# Altium PCB PCB_TEAM07_TH_PCB.PcbDoc
Units mil, origin at the board's own origin, x right, y up, seen from the top; angles counter-clockwise.
Board outline 3503.94 x 3377.95 mil, 2 copper layers (Top Layer, Bottom Layer); 55 components, 37 nets, 188 pads, 33 vias.
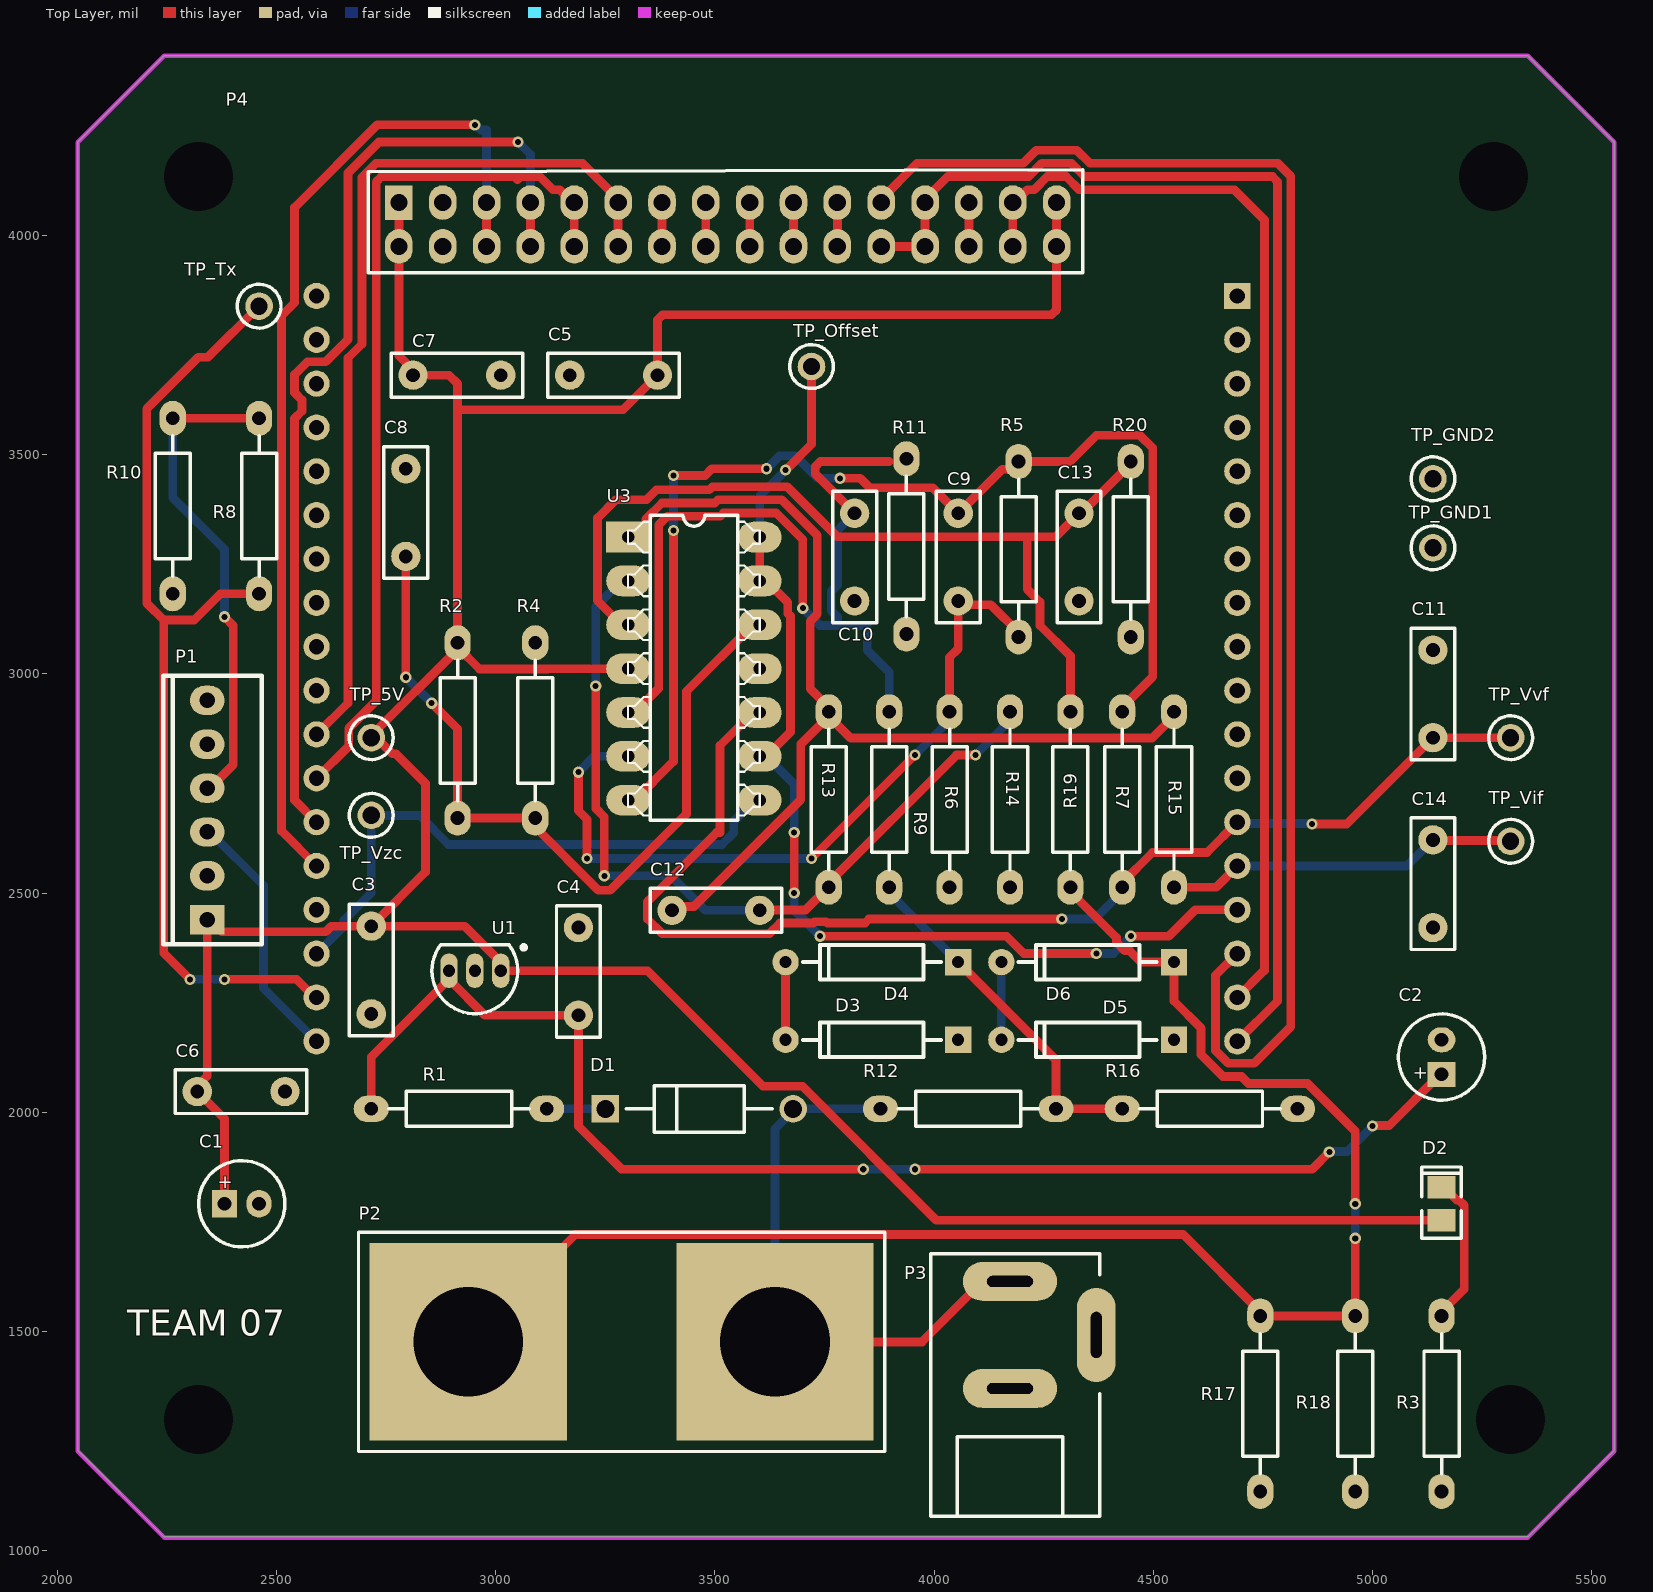
[diagram p0: Top Layer view]
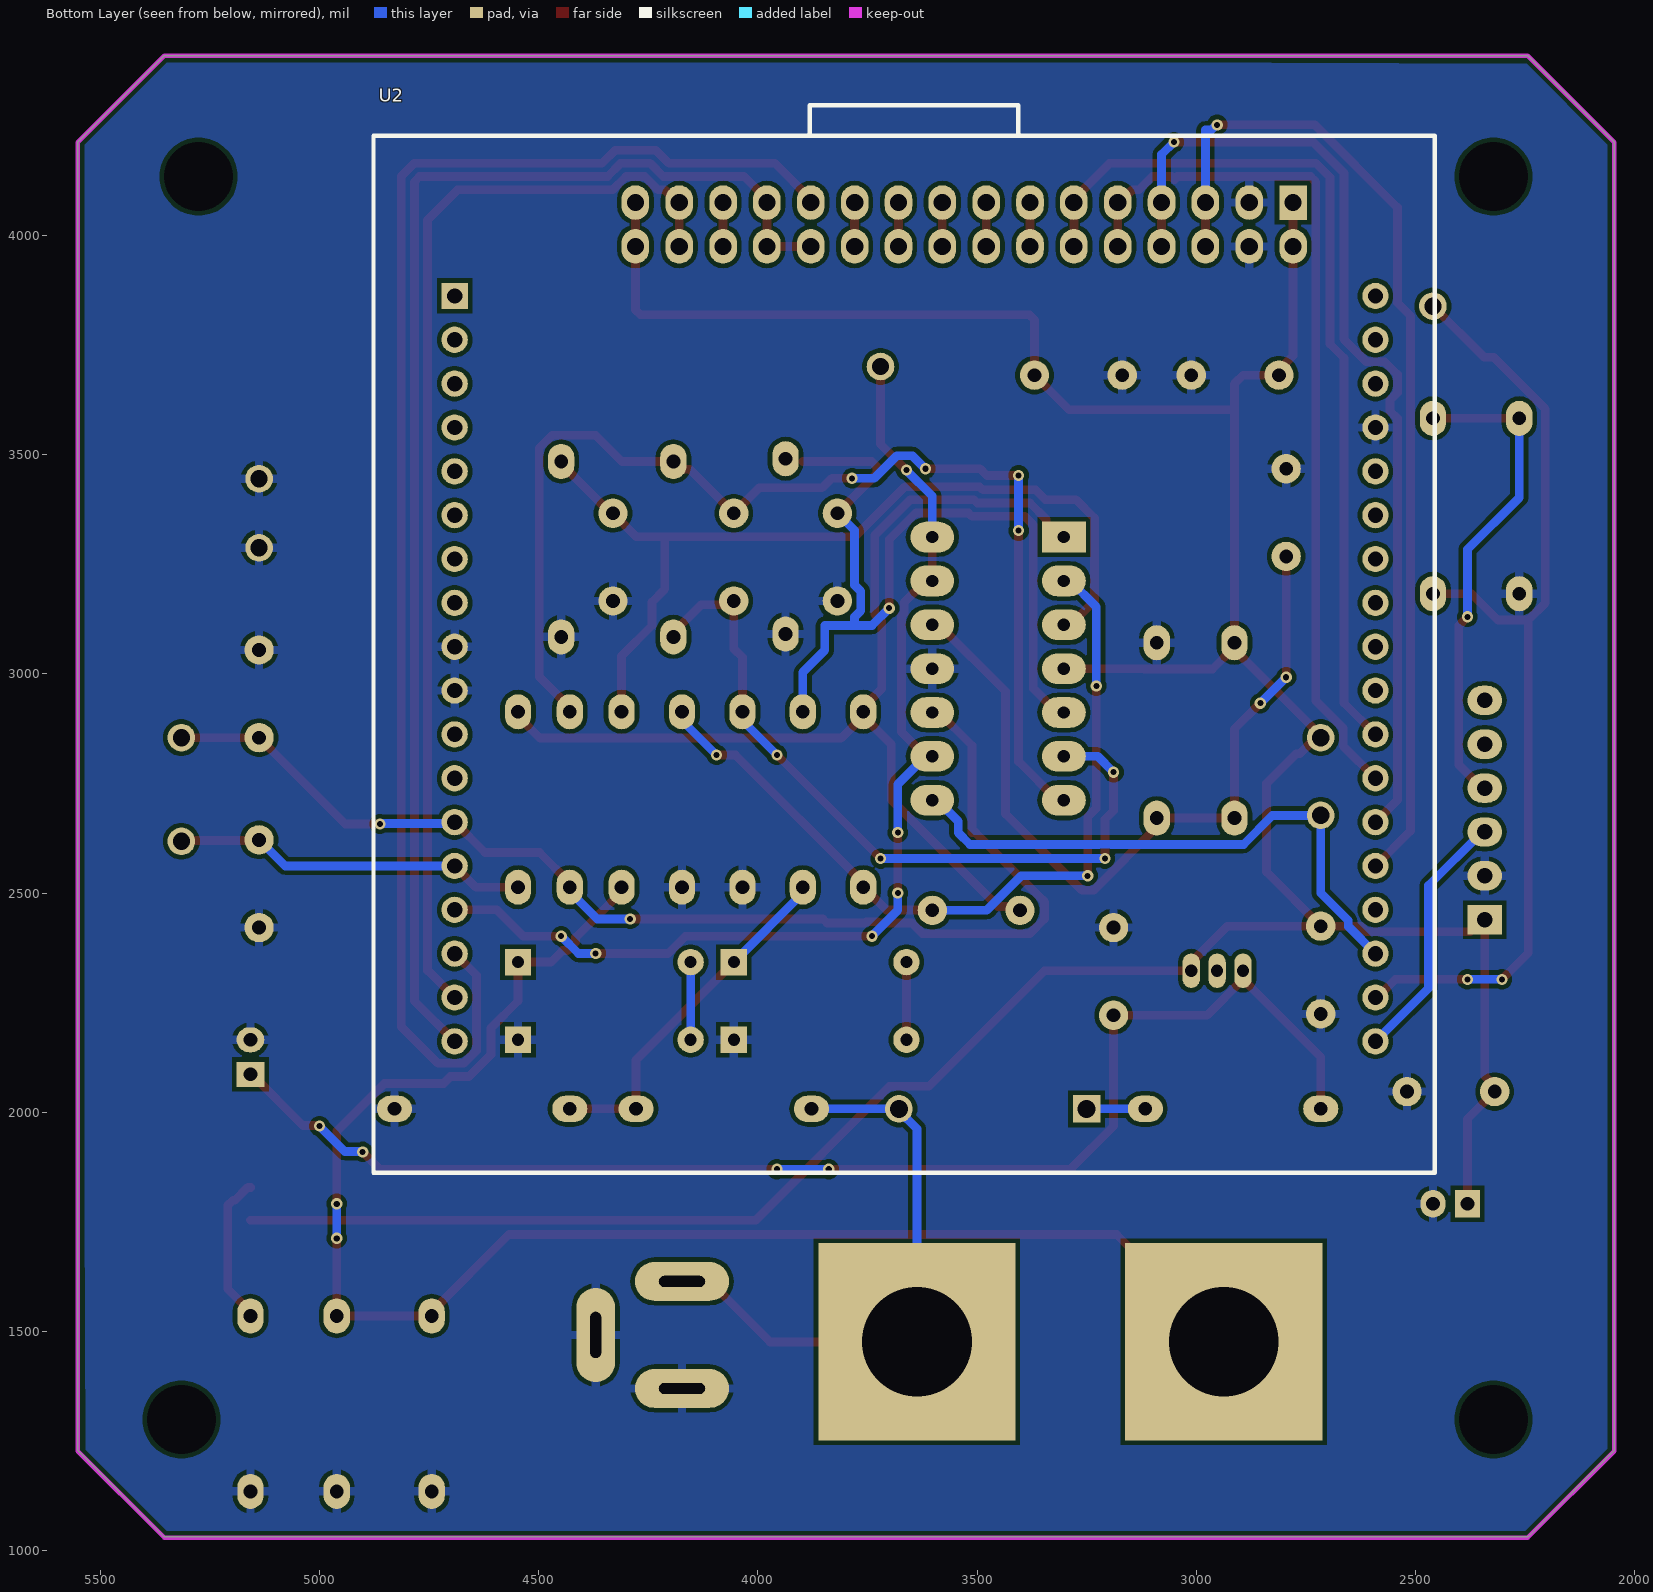
[diagram p1: Bottom Layer view, seen from below]

## Layer stack, top to bottom
Top Solder: solder mask 0.4, Solder Resist, Dk 3.5
Top Layer: signal copper 1.4
Dielectric 1: dielectric 12.6, FR-4, Dk 4.8
Bottom Layer: signal copper 1.4
Bottom Solder: solder mask 0.4, Solder Resist, Dk 3.5

## Board outline
2047.24,1228.35 2047.24,4212.6 2244.09,4409.45 5354.33,4409.45 5551.18,4212.6 5551.18,1228.35 5354.33,1031.5 2244.09,1031.5

## Design rules (kind name [scope] priority, off if disabled: settings)
BoardOutlineClearance [All] p1: gap=11.81 ignorepadtopadclearanceinfootprint=FALSE except(15.75: Arc-SplitBarrior Arc-SplitContinuation Track-SplitBarrior Track-SplitContinuation SMDPad-SplitBarrior SMDPad-SplitContinuation THPad-SplitBarrior THPad-SplitContinuation Via-SplitBarrior Via-SplitContinuation Fill-SplitBarrior Fill-SplitContinuation Poly-SplitBarrior Poly-SplitContinuation Region-SplitBarrior Region-SplitContinuation Text-SplitBarrior Text-SplitContinuation)
Clearance [All] p1: gap=10 ignorepadtopadclearanceinfootprint=TRUE
Height [All] p1: minheight=0 maxheight=1968.5 prefheight=500
HoleSize [All] p1: absolutevalues=TRUE maxlimit=472.44 minlimit=9.84 maxpercent=80.000 minpercent=20.000
MinimumAnnularRing [All] p1: minimumring=5.12
MinimumSolderMaskSliver [All] p1: minsoldermaskwidth=4
PolygonConnect [All] p1: thpad.connectstyle=Relief thpad.reliefconductorwidth=20 thpad.reliefentries=4 thpad.polygonreliefangle="90 Angle" thpad.airgapwidth=10 smdpad.connectstyle=Relief smdpad.reliefconductorwidth=20 smdpad.reliefentries=4 smdpad.polygonreliefangle="90 Angle" smdpad.airgapwidth=10 via.connectstyle=Direct via.reliefconductorwidth=20 via.reliefentries=4 via.polygonreliefangle="90 Angle" via.airgapwidth=10
RoutingVias [All] p1: holewidth=15.75 width=25.59 viastyle="Through Hole" minholewidth=9.84 minwidth=15.75 maxholewidth=39.37 maxwidth=78.74
SilkToSilkClearance [All] p1: silktosilkclearance=4
SilkToSolderMaskClearance [IsPad] p1: minsilkscreentomaskgap=4 clearancetoexposedcopper=TRUE
SolderMaskExpansion [All] p1: expansion=4 istentingtop=FALSE
SupplyNets "Schematic Supply Nets_24" [InNet('LED4')] p1: voltage=0.000
SupplyNets "Schematic Supply Nets_23" [InNet('Isensp')] p2: voltage=0.000
SupplyNets "Schematic Supply Nets_22" [InNet('TX')] p3: voltage=0.000
SupplyNets "Schematic Supply Nets_21" [InNet('GND')] p4: voltage=0.000
SupplyNets "Schematic Supply Nets_20" [InNet('Vin')] p5: voltage=0.000
SupplyNets "Schematic Supply Nets_19" [InNet('RX')] p6: voltage=0.000
SupplyNets "Schematic Supply Nets_18" [InNet('OE')] p7: voltage=0.000
SupplyNets "Schematic Supply Nets_17" [InNet('Offset')] p8: voltage=0.000
SupplyNets "Schematic Supply Nets_16" [InNet('SRCLR')] p9: voltage=0.000
SupplyNets "Schematic Supply Nets_15" [InNet('DS3')] p10: voltage=0.000
SupplyNets "Schematic Supply Nets_14" [InNet('LED3')] p11: voltage=0.000
SupplyNets "Schematic Supply Nets_13" [InNet('DS1')] p12: voltage=0.000
SupplyNets "Schematic Supply Nets_12" [InNet('Vmeas')] p13: voltage=0.000
SupplyNets "Schematic Supply Nets_11" [InNet('SH_CP')] p14: voltage=0.000
SupplyNets "Schematic Supply Nets_10" [InNet('SH_DS')] p15: voltage=0.000
SupplyNets "Schematic Supply Nets_9" [InNet('5V')] p16: voltage=0.000
SupplyNets "Schematic Supply Nets_8" [InNet('DS2')] p17: voltage=0.000
SupplyNets "Schematic Supply Nets_7" [InNet('Vzc')] p18: voltage=0.000
SupplyNets "Schematic Supply Nets_6" [InNet('Imeas')] p19: voltage=0.000
SupplyNets "Schematic Supply Nets_5" [InNet('Vsensp')] p20: voltage=0.000
SupplyNets "Schematic Supply Nets_4" [InNet('Vrect')] p21: voltage=0.000
SupplyNets "Schematic Supply Nets_3" [InNet('SH_ST')] p22: voltage=0.000
SupplyNets "Schematic Supply Nets_2" [InNet('DS4')] p23: voltage=0.000
SupplyNets "Schematic Supply Nets_1" [InNet('LED2')] p24: voltage=0.000
SupplyNets "Schematic Supply Nets" [InNet('LED1')] p25: voltage=0.000
Width [All] p1: maxlimit=400 minlimit=5 preferedwidth=20
25 further rules are at their usual default settings.

## Components (designator, comment, footprint, x,y, rotation, side; value= is the part's Value field where it differs from the comment)
C1 "CAP000212" ECE-CAPPR2-5X11TH 2381.89,1791.34 r0 top value=22uF
C2 "CAP000212" ECE-CAPPR2-5X11TH 5157.48,2086.61 r90 top value=22uF
C3 "CAP000004" ECE-CAPR0.2x0.1TH 2716.54,2424.41 r270 top value=18pF
C4 "CAP000004" ECE-CAPR0.2x0.1TH 3188.98,2221.26 r90 top value=18pF
C5 "CAP000004" ECE-CAPR0.2x0.1TH 3369.29,3681.1 r180 top value=18pF
C6 "CAP000004" ECE-CAPR0.2x0.1TH 2319.68,2047.24 r0 top value=18pF
C7 "CAP000004" ECE-CAPR0.2x0.1TH 2811.81,3681.1 r0 top value=18pF
C8 "CAP000004" ECE-CAPR0.2x0.1TH 2795.28,3267.72 r90 top value=18pF
C9 "CAP000004" ECE-CAPR0.2x0.1TH 4055.12,3366.14 r270 top value=18pF
C10 "CAP000004" ECE-CAPR0.2x0.1TH 3818.9,3366.14 r270 top value=18pF
C11 "CAP000004" ECE-CAPR0.2x0.1TH 5137.8,2854.33 r90 top value=18pF
C12 "CAP000004" ECE-CAPR0.2x0.1TH 3402.36,2460.63 r0 top value=18pF
C13 "CAP000004" ECE-CAPR0.2x0.1TH 4330.71,3366.14 r270 top value=18pF
C14 "CAP000004" ECE-CAPR0.2x0.1TH 5137.8,2621.26 r270 top value=18pF
D1 "1N4007" D-AXIAL0.4 3464.57,2007.87 r0 top
D2 "DIO000104" ECE-LED2012-0805SM 5157.48,1791.34 r90 top value=LTST-C170KGKT
D3 "ZEN000010" ECE-DIOAD2TH1.00 3858.27,2165.35 r180 top value=BZX79-C8V2
D4 "ZEN000010" ECE-DIOAD2TH1.00 3858.27,2342.52 r180 top value=BZX79-C8V2
D5 "ZEN000010" ECE-DIOAD2TH1.00 4350.39,2165.35 r180 top value=BZX79-C8V2
D6 "ZEN000010" ECE-DIOAD2TH1.00 4350.39,2342.52 r180 top value=BZX79-C8V2
P1 "CON000004" ECE-600106STTH 2342.52,2439.37 r180 top value="6 Way"
P2 "Dual Banana Connector" "Dual Banana Connector-Footprint-1" 3287.4,1476.38 r180 top
P3 "AC_Input" "Barrel Jack-Footprint-1" 4173.23,1377.95 r90 top
P4 "7-Segment Display" "7-Segment Display-Footprint-1" 3479.53,4024.8 r180 top
R1 "RES000005" ECE-RESA0.4TH 3116.69,2008.19 r180 top value=2.2
R2 "RES000005" ECE-RESA0.4TH 2913.7,2670.71 r90 top value=2.2
R3 "RES000005" ECE-RESA0.4TH 5157.8,1135.28 r90 top value=2.2
R4 "RES000005" ECE-RESA0.4TH 3090.24,3071.02 r270 top value=2.2
R5 "RES000005" ECE-RESA0.4TH 4193.23,3084.09 r90 top value=2.2
R6 "RES000005" ECE-RESA0.4TH 4035.75,2513.23 r90 top value=2.2
R7 "RES000005" ECE-RESA0.4TH 4429.45,2513.23 r90 top value=2.2
R8 "RES000005" ECE-RESA0.4TH 2460.31,3582.83 r270 top value=2.2
R9 "RES000005" ECE-RESA0.4TH 3897.95,2513.23 r90 top value=2.2
R10 "RES000005" ECE-RESA0.4TH 2264.09,3182.52 r90 top value=2.2
R11 "RES000005" ECE-RESA0.4TH 3937.32,3090.39 r90 top value=2.2
R12 "RES000005" ECE-RESA0.4TH 4278.11,2008.19 r180 top value=2.2
R13 "RES000005" ECE-RESA0.4TH 3760.16,2513.23 r90 top value=2.2
R14 "RES000005" ECE-RESA0.4TH 4173.54,2513.23 r90 top value=2.2
R15 "RES000005" ECE-RESA0.4TH 4547.56,2513.23 r90 top value=2.2
R16 "RES000005" ECE-RESA0.4TH 4829.29,2008.19 r180 top value=2.2
R17 "RES000005" ECE-RESA0.4TH 4744.41,1135.28 r90 top value=2.2
R18 "RES000005" ECE-RESA0.4TH 4960.94,1135.28 r90 top value=2.2
R19 "RES000005" ECE-RESA0.4TH 4311.34,2513.23 r90 top value=2.2
R20 "RES000005" ECE-RESA0.4TH 4449.13,3084.09 r90 top value=2.2
TP_5V "" Test-Pin-TH 2716.54,2854.33 r90 top
TP_GND1 "" Test-Pin-TH 5137.8,3287.4 r90 top
TP_GND2 "" Test-Pin-TH 5137.8,3444.88 r90 top
TP_Offset "" Test-Pin-TH 3720.47,3700.79 r90 top
TP_Tx "" Test-Pin-TH 2460.63,3838.58 r90 top
TP_Vif "" Test-Pin-TH 5314.96,2618.11 r90 top
TP_Vvf "" Test-Pin-TH 5314.96,2854.33 r90 top
TP_Vzc "" Test-Pin-TH 2716.54,2677.17 r0 top
U1 "L78L05ACZ" TO-92 2952.76,2322.83 r90 top
U2 "ATMEGA328P/PB-XMINI" FP-ATMEGA328P-XMINI-MFG 3641.73,3011.81 r180 bottom
U3 "OPA000002" ECE-DIP14TH 3302.36,3311.81 r0 top value=LM324N

## Footprints (in the part's own frame and the unit in brackets; to place one, negate y for a bottom-side part, rotate by r counter-clockwise, add the part's x,y. Pads: shape width x height; smd on the part's side, far side on the other; paste and mask are expansions set on the pad)
"7-Segment Display-Footprint-1" [mm]
  rect 1.6x2 hole 1: 1(17.78,-1.27)
  oval 1.6x2 hole 1: 2(17.78,1.27) 3(15.24,-1.27) 4(15.24,1.27) 5(12.7,-1.27) 6(12.7,1.27) 7(10.16,-1.27) 8(10.16,1.27) 9(7.62,-1.27) 10(7.62,1.27) 11(5.08,-1.27) 12(5.08,1.27) 13(2.54,-1.27) 14(2.54,1.27) 15(0,-1.27) 16(0,1.27) 17(-2.54,-1.27) 18(-2.54,1.27) 19(-5.08,-1.27) 20(-5.08,1.27) 21(-7.62,-1.27) 22(-7.62,1.27) 23(-10.16,-1.27) 24(-10.16,1.27) 25(-12.7,-1.27) 26(-12.7,1.27) 27(-15.24,-1.27) 28(-15.24,1.27) 29(-17.78,-1.27) 30(-17.78,1.27) 31(-20.32,-1.27) 32(-20.32,1.27)
  silkscreen extent -21.84,-3.18 19.56,2.79, body extent -32.6,-50 26.4,4, height 16.89
"Barrel Jack-Footprint-1" [mm]
  oval 2.25x5.45 hole 0.635 slot 2.667 at 90 deg: 1(6,0) 3(-0.2,0)
  oval 5.45x2.25 hole 0.635 slot 2.667 at 0 deg: 2(2.9,-5)
  silkscreen extent -7.6,-5.2 7.6,4.6, body extent -6.7,-5 6,4.2, height 10.5
D-AXIAL0.4 [mm] "AXIAL, 2-Leads, Diameter 2.35mm"
  rect 1.6x1.6 hole 1.05 paste-2539.97 mask+0: 1(-5.438,0)
  round 1.6 hole 1.05 paste-2539.97 mask+0: 2(5.438,0)
  silkscreen extent -4.24,-1.35 4.24,1.35, body extent -6.34,-1.45 6.34,1.45, height 0.25
"Dual Banana Connector-Footprint-1" [mil]
  rect 450x450 hole 250: 1(-350,0) 2(350,0)
  silkscreen extent -600,-250 600,250, body extent -584,-236 586,236, height 217
ECE-600106STTH [mm] "Polarised Header 6 way"
  rect 2x1.7 hole 0.9: 1(0,0)
  oval 2x1.7 hole 0.9: 2(0,-2.54) 3(0,-5.08) 4(0,-7.62) 5(0,-10.16) 6(0,-12.7)
  silkscreen extent -3.16,-14.12 2.54,1.42
ECE-CAPPR2-5X11TH [mm] "Polarised Radial Cap Dia 5mm"
  rect 1.45x1.6 hole 0.8: 1(0,0)
  oval 1.45x1.6 hole 0.8: 2(2,0)
  silkscreen extent -1.5,-2.5 3.5,2.5, body extent -1.5,-2.5 3.5,2.5, height 11.43
ECE-CAPR0.2x0.1TH [mm] "Radial non polarised Capacitor"
  round 1.7 hole 0.8: 1(0,0) 2(5.08,0)
  silkscreen extent -1.27,-1.27 6.35,1.27
ECE-DIOAD2TH1.00 [mil] "Axial 10mm diode"
  rect 60x60 hole 27.56: 1(-196.85,0)
  round 60 hole 27.56: 2(196.85,0)
  silkscreen extent -157,-39 157,39
ECE-DIP14TH [mil] "14 pin Dual in line"
  rect 100x70 hole 28: 1(0,0)
  oval 100x70 hole 28: 2(0,-100) 3(0,-200) 4(0,-300) 5(0,-400) 6(0,-500) 7(0,-600) 8(300,-600) 9(300,-500) 10(300,-400) 11(300,-300) 12(300,-200) 13(300,-100) 14(300,0)
  silkscreen extent 0,-646 300,50
ECE-LED2012-0805SM [mm] "RED AS AlGaAs SMD LED, Body; 2mm x 1.25 mm (LxW)"
  rect 1.3x1.6 smd: 1(-0.95,0) 2(0.95,0)
  silkscreen extent -2,-1.15 2.13,1.15
ECE-RESA0.4TH [mil] "Resistor Axial 10mm"
  oval 80x60 hole 31.5: 1(0.16,0.32) 2(400.16,0.32)
  silkscreen extent 40,-40 360,40, body extent -7,-47 417,47, height 95
FP-ATMEGA328P-XMINI-MFG [mil]
  rect 60x60 hole 35: 1(-1050,850)
  round 60 hole 35: 2(-1050,750) 3(-1050,650) 4(-1050,550) 5(-1050,450) 6(-1050,350) 7(-1050,250) 8(-1050,150) 9(-1050,50) 10(-1050,-50) 11(-1050,-150) 12(-1050,-250) 13(-1050,-350) 14(-1050,-450) 15(-1050,-550) 16(-1050,-650) 17(-1050,-750) 18(-1050,-850) 19(1050,-850) 20(1050,-750) 21(1050,-650) 22(1050,-550) 23(1050,-450) 24(1050,-350) 25(1050,-250) 26(1050,-150) 27(1050,-50) 28(1050,50) 29(1050,150) 30(1050,250) 31(1050,350) 32(1050,450) 33(1050,550) 34(1050,650) 35(1050,750) 36(1050,850)
  silkscreen extent -1235,-1150 1185,1285, body extent -1206,-1151 1156,1844, height 650
Test-Pin-TH [mm]
  round 1.6 hole 1: 1(0,0)
  silkscreen extent -1.27,-1.27 1.27,1.27, body extent -1.27,-1.27 1.27,1.27, height 4.57
TO-92 [mm] "TO, Flat Index; 3 In-Line, Axial Leads; Body Dia. 4.7mm; Lead Dia. 0.56 mm (max)"
  oval 2x1 hole 0.7: 1(0,-1.5) 2(0,0) 3(0,1.5)
  silkscreen extent -2.48,-2.96 1.5,2.48, body extent -2.4,-2.4 1.53,2.4, height 6.73

## Part data
C1 C2: library part CMP-039-000101-1, "CAP ELEC 22uF 25V TH", Manufactuer=Nichicon, Manufacturer-PN=UVZ1E220MDD, Size/Package=5X11, Voltage/Current=25V, Assembly Method="Through hole", Category=Capacitor, Component Type=NA, Datasheet Link=http://share.engineering.auckland.ac.nz/ece/ts/Student%20Documents/CAP-UVZ1E100MDD.pdf, Item Type=Item, Path="ece/ts/Lists/Stock Inventory", Review-date=41979, Status=Active, Supplier1=Electus, Supplier1-PN=RE6090, UoA Stock#=CAP000212
C3 C4 C5 C6 C7 C8 C9 C10 C11 C12 C13 C14: library part CMP-039-000003-1, "CAP CER 18pF 50V TH", Size/Package=Radial, Voltage/Current=50V, Assembly Method="Through hole", Category=Capacitor, Component Type=NA, Datasheet Link=http://share.engineering.auckland.ac.nz/ece/ts/Student%20Documents/CER%20CAP.pdf, Item Type=Item, Path="ece/ts/Lists/Stock Inventory", Status=Obsolete, UoA Stock#=CAP000004
D1: library part CMP-00015-1, "Standard Rectifier Diode Switching 1KV 1A Axial 0.4", Current Rating=1A, Forward Voltage=1.1V
D2: library part CMP-043-000010-1, "LED GREEN CLEAR 0805 SM", Manufactuer="Lite-On Inc", Manufacturer-PN=LTST-C170KGKT, Size/Package="0805 (2012 Metric)", Voltage/Current=20mA, Assembly Method="Surface Mount", Category=Diode, Component Type=LED-0805-GREEN, Datasheet Link=http://share.engineering.auckland.ac.nz/ece/ts/Student%20Documents/LED-S_110_LTST-C170KGKT.pdf, Item Type=Item, Path="ece/ts/Lists/Stock Inventory", Status=Active, Supplier1=Digikey, Supplier1-PN=160-1414-6-ND, UoA Stock#=DIO000104
D3 D4 D5 D6: library part CMP-055-000009-1, "8.2V Zener Diodes TH", Manufactuer=NXP, Manufacturer-PN=BZX79-C8V2, Voltage/Current=8.2V, Assembly Method="Through hole", Category=Zener, Item Type=Item, Path="ece/ts/Lists/Stock Inventory", Status=Active, Supplier1=Element14, Supplier1-PN=1097242, UoA Stock#=ZEN000010
P1: library part CMP-040-000003-1, "HEADER POLARISED 6WAY TH", Manufactuer=GTK, Manufacturer-PN=600106ST, Size/Package="2.54 Radial", Assembly Method="Through hole", Category=Connector, Component Type=NA, Datasheet Link=http://share.engineering.auckland.ac.nz/ece/ts/Student%20Documents/polarised_connectors.pdf, Item Type=Item, Path="ece/ts/Lists/Stock Inventory", Status=Active, Supplier1=Elecon, Supplier1-PN=YY3N06, Supplier2="Active Components", Supplier2-PN=600106ST, UoA Stock#=CON000004
P2: library part CMP-00017-1, "Dual Banan connector"
P3: library part CMP-002-00000-1, "Barrel jack"
P4: library part CMP-00020-1, "7-Segment display for EC209"
R1 R2 R3 R4 R5 R6 R7 R8 R9 R10 R11 R12 R13 R14 R15 R16 R17 R18 R19 R20: library part CMP-052-000004-1, "RES MF 2R2 TH", Size/Package="Axial 10mm", Voltage/Current=0.6W, Assembly Method="Through hole", Category=Resistor, Component Type=NA, Item Type=Item, Path="ece/ts/Lists/Stock Inventory", Status=Active, Supplier1="Active components", Supplier1-PN=T462168, UoA Stock#=RES000005
TP_5V TP_GND1 TP_GND2 TP_Offset TP_Tx TP_Vif TP_Vvf TP_Vzc: library part CMP-00024-1, "Test pin TH generic"
U1: library part CMP-00021-1, "Pwr Sply Func, Voltage Regulator, Positive Voltage Out, TO-92, Is 5.5MA, Vo 5V, VI 10V", Case/Package=TO-92, Max Output current=100mA, Max Supply Voltage=20V, Output Voltage=5V, Output Voltage Accuracy=4%, Power Supply Rejection Ratio (PSRR)=49dB, Quiescent Current=6mA
U2: library part CMP-00018-1, "Evaluation Board, ATMEGA328P/PB MCU, On-Board Debugger, Auto-ID Identification", Max Supply Voltage=5V, Number of Bits=8, Number of I/Os=22
U3: library part CMP-049-000001-1, "IC OPAMP LM324 QUAD TH", Manufactuer="Texas instruments", Manufacturer-PN=LM324N, Size/Package=DIP14, Assembly Method="Through hole", Category=OpAmp, Datasheet Link=http://share.engineering.auckland.ac.nz/ece/ts/Student%20Documents/LM324.pdf, Item Type=Item, Path="ece/ts/Lists/Stock Inventory", Status=Active, Supplier1=Digikey, Supplier1-PN=296-1391-5-ND, Supplier2="Active Components", Supplier2-PN=LM324N, UoA Stock#=OPA000002

## Free pads (board coordinates)
  oval 157x60 hole 157 unplated: 5(2322.83,1299.21) 5(2322.83,4133.86) 5(5275.59,4133.86) 5(5314.96,1299.21)

## Via types
v1: diameter 25.59, hole 13.78, Top Layer to Bottom Layer, 33 vias

## Nets (pads, with @x,y where several pads share a name; then routed paths per layer and width w, separated by ;. In a path a pad name is that pad's centre, name@x,y a point inside that pad or via, vN(x,y) a via of type N, cw(c..) or ccw(c..) an arc to the next point about the centre after c; other vN are vias at no path point)
5V: C1.1 C3.1 C5.1 C6.1 C7.1 D2.1 P1.1 P4.1 P4.2 P4.31 P4.32 R2.2 TP_5V.1 U1.1 U3.4 | length 7936.2
  Top Layer w20: P1.1 2342.52,2082.78 2319.68,2059.94 C6.1 2381.89,1985.04 C1.1 ; P1.1@2348.43,2439.37 2375.98,2411.81 2612.44,2411.81 2625.04,2424.41 C3.1 ; P4.1 P4.2 2779.53,3726.08 2811.81,3693.8 C7.1 2893.7,3681.1 2913.39,3661.42 2913.39,3602.36 ; U3.4 3119.71,3011.81 3118.76,3010.87 2963.39,3010.87 R2.2@2913.39,3060.87 ; P4.31 P4.32 4279.53,3830.61 4267.81,3818.9 3381.01,3818.9 3369.29,3807.18 C5.1 3290.55,3602.36 2913.39,3602.36 ; D2.1 4005.43,1753.94 3699.99,2059.37 3609.92,2059.37 3346.46,2322.83 U1.1 3011.81,2342.52 2929.92,2424.41 C3.1 ; C3.1 2840,2547.87 2840,2750.55 2772.73,2817.82 2764.68,2817.82 2728.17,2854.33 TP_5V.1 2716.54,2859.17 2913.39,3056.02 R2.2@2913.39,3060.87 ; R2.2@2913.39,3060.87 R2.2 2913.39,3602.36
DS1: P4.5 P4.6 U2.23 | length 2333.4
  Top Layer w20: U2.23 2511.73,2641.81 2511.73,3816.86 2541.73,3846.86 2541.73,4063.44 2730.26,4251.97 v1(2952.76,4251.97) ; P4.6 P4.5
  Bottom Layer w20: v1(2952.76,4251.97) 2954.27,4251.97 2965.98,4240.25 2979.53,4240.25 P4.5
DS2: P4.7 P4.8 U2.24 | length 2256.5
  Top Layer w20: U2.24 2541.73,2711.81 2541.73,3582.52 2558.6,3599.38 2558.6,3624.24 2541.73,3641.1 2541.73,3682.52 2571.02,3711.81 2612.44,3711.81 2663.67,3763.04 2663.67,4142.95 2733.32,4212.6 v1(3051.18,4212.6) ; P4.8 P4.7
  Bottom Layer w20: v1(3051.18,4212.6) 3079.53,4184.25 P4.7
DS3: P4.9 P4.10 U2.25 | length 2003.9
  Top Layer w20: U2.25 2665.04,2835.12 2665.04,2875.66 2728.03,2938.65 2728.03,4122.46 2739.75,4134.17 3043.08,4134.17 3050.1,4127.15 3057.12,4134.17 3100.86,4134.17 3130.86,4104.17 3146.4,4104.17 3175.77,4074.8 P4.9 P4.10
DS4: P4.11 P4.12 U2.26 | length 2052.4
  Top Layer w20: U2.26 2663.35,2933.43 2663.35,3720.3 2695.34,3752.28 2695.34,4132.19 2727.32,4164.17 3198.03,4164.17 3279.53,4082.68 P4.11 P4.12
GND: C1.2 C2.2 C3.2 C4.2 C5.2 C6.2 C7.2 C8.2 C10.2 C11.2 C13.2 C14.2 D3.1 D5.1 P1.2 P3.2 P3.3 P4.3 P4.4 R3.1 R4.1 R6.1 R10.1 R11.1 R14.1 R16.1 R17.1 R18.1 R20.1 TP_GND1.1 TP_GND2.1 U2.9 U2.10 U2.33 U3.11
Imeas: C14.1 R15.1 TP_Vif.1 U2.14 | length 813.7
  Top Layer w20: R15.1 4643.31,2513.39 U2.14 ; C14.1 5139.37,2619.68 5313.39,2619.68 TP_Vif.1
  Bottom Layer w20: U2.14 5078.35,2561.81 C14.1
Isensp: D6.1 P2.2 R17.2 R18.2 R19.1 | length 3608.7
  Top Layer w20: P2.2 3182.4,1721.38 4568.15,1721.38 4744.09,1545.43 R17.2 R18.2 v1(4960.63,1712.6) ; R19.1 4311.02,2503.39 4416.02,2398.39 4416.02,2387.99 4435.23,2368.78 4445.63,2368.78 4471.89,2342.52 D6.1 4547.24,2253.64 4609.13,2191.75 4609.13,2131.27 4658.6,2081.81 4701.02,2081.81 4717.44,2065.39 4852.32,2065.39 4960.63,1957.09 v1(4960.63,1791.34)
  Bottom Layer w20: v1(4960.63,1712.6) v1(4960.63,1791.34)
LED1: P4.13 P4.14 | length 100
  Top Layer w20: P4.14 P4.13
LED2: P4.15 P4.16 | length 100
  Top Layer w20: P4.16 P4.15
LED3: P4.17 P4.18 | length 100
  Top Layer w20: P4.18 P4.17
LED4: P4.19 P4.20 | length 100
  Top Layer w20: P4.20 P4.19
NetC8_1: C8.1 R2.1 R4.2 U3.12 | length 1829.2
  Top Layer w20: v1(2795.28,2992.13) C8.1 ; v1(2854.33,2933.07) 2913.39,2874.02 R2.1 R4.2 3090.55,2650.47 3234.45,2506.57 3261.62,2506.57 3435.51,2680.47 3435.51,2959.96 3587.36,3111.81 U3.12
  Bottom Layer w20: v1(2795.28,2992.13) v1(2854.33,2933.07)
NetC9_1: C9.1 R5.2 R7.2 U3.7 | length 2674.7
  Top Layer w20: U3.7 3317.36,2711.81 3405.51,2799.96 v1(3405.51,3326.77) ; v1(3405.51,3452.36) 3477.93,3452.36 3493.22,3467.65 v1(3618.13,3467.65) ; v1(3785.46,3445.96) 3831.91,3445.96 3853.62,3424.25 3997.01,3424.25 C9.1 4155.57,3466.6 4175.26,3466.6 R5.2 4310.46,3484.25 4370.46,3544.25 4469.53,3544.25 4498.82,3514.96 4498.82,2993.07 4429.13,2923.39 R7.2
  Bottom Layer w20: v1(3405.51,3326.77) v1(3405.51,3452.36) ; v1(3618.13,3467.65) 3647.83,3497.36 3683.25,3497.36 3734.66,3445.96 v1(3785.46,3445.96)
NetC9_2: C9.2 R5.1 R6.2 U3.6 | length 1748.8
  Top Layer w20: v1(3188.98,2775.59) 3188.98,2687.76 3208.66,2668.08 v1(3208.66,2578.74) ; v1(3720.47,2578.74) v1(3956.69,2814.96) ; R6.2 4035.43,3037.81 4055.12,3057.5 C9.2 4063.5,3157.76 4129.41,3157.76 4192.91,3094.25 R5.1
  Bottom Layer w20: v1(3188.98,2775.59) 3225.2,2811.81 U3.6 ; v1(3208.66,2578.74) v1(3720.47,2578.74) ; v1(3956.69,2814.96) 4035.43,2893.7 R6.2
NetC10_1: C10.1 R9.2 R11.2 U3.5 | length 1969.2
  Top Layer w20: U3.5 3317.36,2911.81 3372.36,2966.81 3372.36,3340 3391.93,3359.57 3512.41,3359.57 3519.66,3366.81 3640.14,3366.81 3700.79,3306.17 v1(3700.79,3149.61) ; C10.1@3819.17,3365.87 3729.07,3455.97 3729.07,3472.54 3740.79,3484.25 3897.64,3484.25
  Bottom Layer w20: v1(3700.79,3149.61) 3740.16,3110.24 3779.53,3110.24 ; C10.1 3779.53,3326.77 3779.53,3202.38 3765.43,3188.29 3765.43,3144 3779.53,3129.9 3779.53,3110.24 ; R9.2 3897.64,3003.54 3847.64,3053.54 3847.64,3110.24 3779.53,3110.24
NetC12_1: C12.1 R13.2 R15.2 U3.1 | length 2399.8
  Top Layer w20: U3.1 3317.36,3311.81 3342.36,3336.81 3342.36,3352.43 3379.5,3389.57 3499.99,3389.57 3507.23,3396.81 3652.57,3396.81 3733.58,3315.8 3733.58,3136.02 3717.42,3119.86 3717.42,2965.81 3759.84,2923.39 R13.2@3759.84,2903.39 ; C12.1 3411.34,2469.61 3452.94,2469.61 3696.17,2712.83 3696.17,2839.71 R13.2@3759.84,2903.39 ; R15.2 4547.24,2903.39 4497.24,2853.39 3809.84,2853.39 R13.2@3759.84,2903.39
NetC12_2: C12.2 R13.1 R14.2 U3.2 | length 1882.8
  Top Layer w20: v1(3228.35,2972.44) 3228.35,2693.05 3248.03,2673.36 v1(3248.03,2539.37) ; C12.2 3603.31,2461.57 3707.21,2461.57 3759.02,2513.39 R13.1 3759.84,2523.39 4051.42,2814.96 v1(4094.49,2814.96)
  Bottom Layer w20: v1(3228.35,2972.44) 3228.35,3152.8 3287.36,3211.81 U3.2 ; v1(3248.03,2539.37) 3399.23,2539.37 3477.97,2460.63 C12.2 ; v1(4094.49,2814.96) 4173.23,2893.7 R14.2
NetC13_1: C13.1 R19.2 R20.2 U3.3 | length 2088.6
  Top Layer w20: U3.3 3287.36,3111.81 3232.36,3166.81 3232.36,3355.1 3274.08,3396.81 3344.32,3396.81 3367.07,3419.57 3487.56,3419.57 3494.8,3426.81 3665,3426.81 3779.13,3312.68 4212.6,3312.68 ; R19.2 4311.02,3040.87 4241.65,3110.24 4241.65,3163.56 4212.6,3192.62 4212.6,3312.68 ; R20.2 4448.82,3479.25 4335.71,3366.14 C13.1 4277.24,3312.68 4212.6,3312.68
NetD1_1: D1.1 R1.1 | length 133.9
  Bottom Layer w20: R1.1 D1.1
NetD2_2: D2.2 R3.2 | length 342.2
  Top Layer w20: R3.2 5157.48,1545.43 5208.98,1596.93 5208.98,1787.81 5197.26,1799.53 5192.6,1799.53 5163.39,1828.74 D2.2
NetD3_2: D3.2 D4.2 | length 177.2
  Top Layer w20: D3.2 D4.2
NetD5_2: D5.2 D6.2 | length 177.2
  Bottom Layer w20: D5.2 D6.2
NetP1_4: P1.4 R8.1 R10.2 | length 1125.4
  Top Layer w20: R10.2 R8.1 ; P1.4 2348.43,2739.37 2401.89,2792.83 2401.89,3109.92 v1(2381.89,3129.92)
  Bottom Layer w20: R10.2 2263.78,3401.87 2381.89,3283.76 v1(2381.89,3129.92)
OE: P4.27 P4.28 | length 100
  Top Layer w20: P4.28 P4.27
Offset: TP_Offset.1 U2.15 U3.9 U3.13 U3.14 | length 2498.7
  Top Layer w20: U3.9 3617.36,2811.81 3672.36,2866.81 3672.36,3131.65 3666.17,3137.85 3666.17,3163.01 3617.36,3211.81 U3.13 U3.14 ; v1(3661.42,3464.57) 3720.47,3523.62 TP_Offset.1 ; v1(3681.1,2500) v1(3681.1,2637.8) ; v1(3740.16,2401.57) 4165.2,2401.57 4204.57,2362.2 v1(4370.08,2362.2) ; v1(4448.82,2401.57) 4535.5,2401.57 4595.74,2461.81 U2.15
  Bottom Layer w20: U3.9 3617.36,2811.81 3681.1,2748.07 v1(3681.1,2637.8) ; U3.14 3602.36,3405.51 v1(3661.42,3464.57) ; v1(3681.1,2500) 3681.1,2460.63 v1(3740.16,2401.57) ; v1(4370.08,2362.2) 4409.45,2362.2 v1(4448.82,2401.57)
RX: P1.3 U2.19 | length 584.2
  Bottom Layer w20: P1.3 2348.43,2639.37 2470.74,2517.05 2470.74,2282.8 U2.19
SH_CP: P4.23 U2.16 | length 3412
  Top Layer w20: P4.23 3879.53,4082.68 3961.02,4164.17 4203.34,4164.17 4233.34,4194.17 4325.71,4194.17 4355.71,4164.17 4784.18,4164.17 4813.46,4134.88 4813.46,2195.35 4729.92,2111.81 4671.02,2111.81 4641.73,2141.1 4641.73,2311.81 U2.16
SH_DS: P4.29 P4.30 U2.17 | length 2538.8
  Top Layer w20: P4.30 P4.29 4183.29,4074.8 4212.66,4104.17 4228.2,4104.17 4258.2,4134.17 4300.86,4134.17 4330.86,4104.17 4685.04,4104.17 4753.46,4035.75 4753.46,2323.54 U2.17
SH_ST: P4.24 P4.25 P4.26 U2.18 | length 3061.5
  Top Layer w20: P4.24 P4.26 3979.53,4082.68 4031.02,4134.17 4215.77,4134.17 4245.77,4164.17 4313.28,4164.17 4343.28,4134.17 4771.75,4134.17 4783.46,4122.46 4783.46,2253.54 U2.18
SRCLR: P4.21 P4.22 | length 100
  Top Layer w20: P4.22 P4.21
TX: R8.2 TP_Tx.1 U2.20 | length 2243
  Top Layer w20: v1(2303.15,2303.15) 2243.07,2363.23 2243.07,3122.68 ; v1(2381.89,2303.15) 2546.08,2303.15 2587.42,2261.81 U2.20 ; R8.2 2372.61,3182.68 2312.61,3122.68 2243.07,3122.68 ; TP_Tx.1 2343.92,3721.87 2322.26,3721.87 2204.72,3604.33 2204.72,3161.02 2243.07,3122.68
  Bottom Layer w20: v1(2303.15,2303.15) v1(2381.89,2303.15)
Vin: D1.2 P2.1 P3.1 R12.2 | length 1340.8
  Top Layer w20: P2.1 3972.44,1476.38 4110.24,1614.17 P3.1
  Bottom Layer w20: P2.1 3637.4,1962.17 3678.66,2003.43 D1.2 R12.2
Vmeas: C11.1 R7.1 TP_Vvf.1 U2.13 U3.10 | length 2775.7
  Top Layer w20: 3348.9,2482.76 3346.46,2480.32 3346.46,2440.93 3380.22,2407.17 3624.51,2407.17 3648.92,2431.57 3723.78,2431.57 3726.57,2434.37 3753.74,2434.37 3756.54,2431.57 3842.54,2431.57 3851.91,2440.94 v1(4291.34,2440.94) ; 3348.9,2482.78 3503.92,2637.8 3511.91,2637.8 3511.91,2836.36 3587.36,2911.81 U3.10 ; R7.1 4429.13,2523.39 4498.35,2592.6 4622.52,2592.6 U2.13 ; v1(4862.2,2657.48) 4940.94,2657.48 C11.1 TP_Vvf.1
  Bottom Layer w20: v1(4291.34,2440.94) 4366.69,2440.94 4429.13,2503.39 R7.1 ; U2.13 4694.99,2658.55 4861.14,2658.55 v1(4862.2,2657.48)
Vrect: C2.1 C4.1 R1.2 U1.3 | length 3069.3
  Top Layer w20: R1.2 2716.54,2125.98 U1.3@2893.7,2303.15 ; U1.3 U1.3@2893.7,2303.15 ; v1(3838.58,1870.08) 3287.4,1870.08 3188.98,1968.5 C4.1 2975.59,2221.26 U1.3@2893.7,2303.15 ; v1(3956.69,1870.08) 4862.2,1870.08 v1(4901.57,1909.45) ; v1(5000,1968.5) 5001.07,1969.57 5037.49,1969.57 5154.53,2086.61 C2.1
  Bottom Layer w20: v1(3838.58,1870.08) v1(3956.69,1870.08) ; v1(4901.57,1909.45) 4902.64,1910.52 4942.01,1910.52 v1(5000,1968.5)
Vsensp: D4.1 R9.1 R12.1 R16.2 | length 814.2
  Top Layer w20: D4.1 4277.95,2119.68 R12.1 R16.2
  Bottom Layer w20: R9.1 3897.64,2500 D4.1
Vzc: TP_Vzc.1 U2.21 U3.8 | length 1338
  Bottom Layer w20: U2.21 2653.85,2423.93 2653.85,2437.33 2716.54,2500.02 TP_Vzc.1 2826.38,2677.17 2892.68,2610.87 3194.41,2610.87 3195.08,2611.54 3222.25,2611.54 3222.91,2610.87 3516.38,2610.87 3543.31,2637.8 3543.31,2663.94 3591.18,2711.81 U3.8
pads on no net: P1.5 P1.6 U1.2 U2.1 U2.2 U2.3 U2.4 U2.5 U2.6 U2.7 U2.8 U2.11 U2.12 U2.22 U2.27 U2.28 U2.29 U2.30 U2.31 U2.32 U2.34 U2.35 U2.36

## Polygon pours and split planes (outlines as drawn)
GND on Bottom Layer "GND_L02_P000" (solid, pour order 0): 2047.24,4389.76 5551.18,4409.45 5531.5,1031.5 2047.24,1031.5

## Keep-outs
Keep-Out Layer:
  lines w10: 2047.24,1226.85 2244.09,1030 5354.33,1030 5551.18,1226.85 5551.18,4212.6 5354.33,4409.45 2244.09,4409.45 2047.24,4212.6 2047.24,1226.85

## Silkscreen, mask and mechanical layers (free items; w line width, h text height)
Top Overlay:
  text "TEAM 07" at 2160,1490 h60
Mechanical 1:
  the board outline again, w10

## Text inside footprints (layer, text, board x,y; h text height)
C1: Top Overlay "+" at 2366.89,1826.34 h30
C2: Top Overlay "+" at 5122.48,2071.61 h30 r90